# Altium PCB LST.PcbDoc (part 3 of 6)
Units mil, origin at the board's own origin, x right, y up, seen from the top; angles counter-clockwise.
Board outline 4330.71 x 4330.71 mil, 2 copper layers (Top Layer, Bottom Layer), stack 50 mil thick; 464 components, 242 nets, 1328 pads, 128 vias.
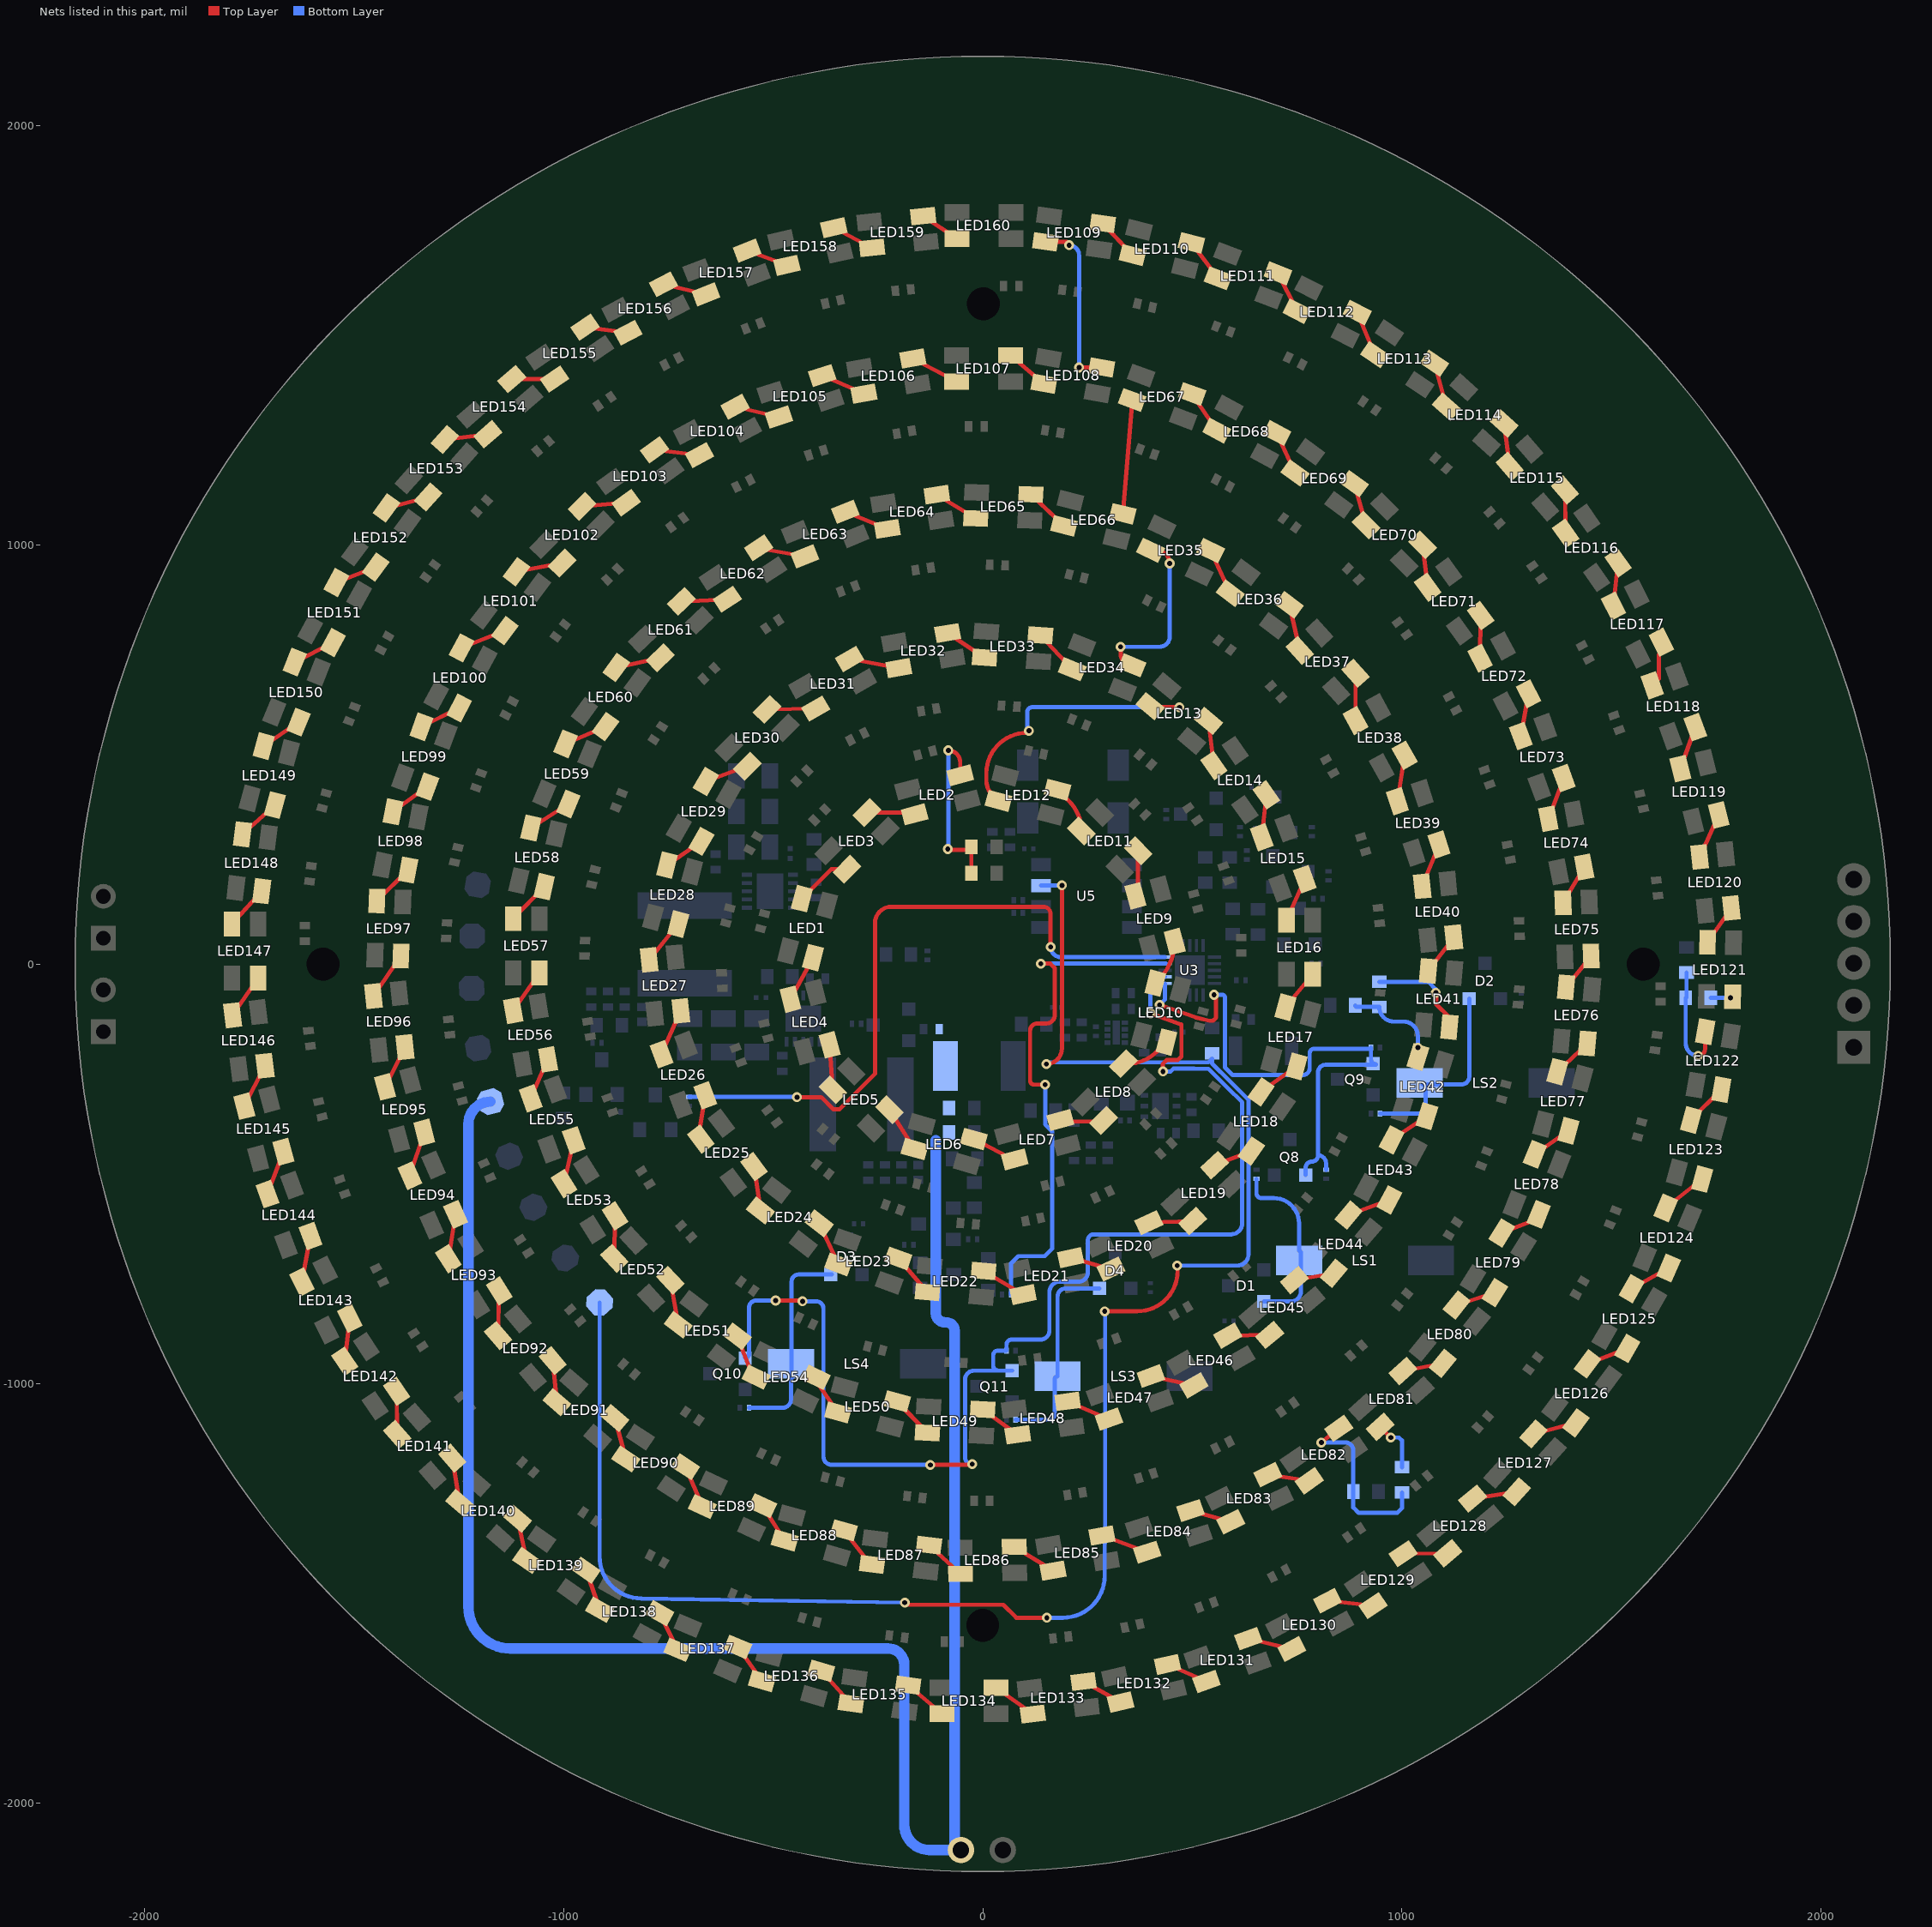
[diagram p2: the nets of this part, all layers, seen from the top]

## Part data (continued)
X1: library part CM200C32768DZFT, "CRYSTAL 32.7680KHZ 12.5PF SMD", Case/Package=SMD/SMT, ESR (Equivalent Series Resistance)=50kR, Frequency=32.768kHz, Frequency Tolerance=20ppm, Load Capacitance=12.5pF, Manufacturer=Citizen, Max Operating Temperature=85°C, Min Operating Temperature=-40°C, Package Quantity=3000, Supplier Part Number 1=695-CM200C-32768DZFT, Category=Crystals, ComponentLink1Description=https://datasheet.ciiva.com/13163/cm200c-citizen-187069-13163866.pdf?src-supplier=Mouser, ComponentLink1URL=https://datasheet.ciiva.com/13163/cm200c-citizen-187069-13163866.pdf?src-supplier=Mouser, ComponentLink2Description=https://datasheet.ciiva.com/16437/cm200c-250c-16437102.pdf?src-supplier=Future+Electronics, ComponentLink2URL=https://datasheet.ciiva.com/16437/cm200c-250c-16437102.pdf?src-supplier=Future+Electronics, ComponentLink3Description=https://datasheet.ciiva.com/48778/1673496-48778901.pdf?src-supplier=Element14, ComponentLink3URL=https://datasheet.ciiva.com/48778/1673496-48778901.pdf?src-supplier=Element14, Lead Free="Lead Free", Manufacturer Part Number=CM200C32768DZFT, Mount="Surface Mount", Packaging="Tape and Reel", Pricing 1="1=0.57000, 10=0.47500, 50=0.42700, 100=0.38000, 1000=0.30400, 10000=0.25400 (USD)", REACH SVHC=Unknown, RoHS=Yes, Stock 1=1, Supplier 1=Mouser

## Free pads (board coordinates)
  round 60 hole 78.74 unplated: MH1(2,1576) MH2(1576,0) MH3(0,-1577) MH4(-1574,0)

## Via types
v1: diameter 23.62, hole 11.81, Top Layer to Bottom Layer, tented top, 98 vias
v2: diameter 23.62, hole 11.81, Top Layer to Bottom Layer, 30 vias

## Nets (pads, with @x,y where several pads share a name; then routed paths per layer and width w, separated by ;. In a path a pad name is that pad's centre, name@x,y a point inside that pad or via, vN(x,y) a via of type N, cw(c..) or ccw(c..) an arc to the next point about the centre after c; other vN are vias at no path point)
A_LED_INPUT: LED2.4 SB1.2 SB2.2 | length 433.7
  Top Layer w10: v1(-83.29,275.13) ccw(c-81.55,275.13) -81.55,273.39 -34,273.39 ccw(c-34,280.39) SB2.2@-27,280.39 SB1.2@-27,217.39 ; v1(-82,510.39) cw(c-82,482.07) -53.68,482.07 LED2.4@-53.68,451.09
  Bottom Layer w10: v1@-82,276.42 v1(-82,510.39)
B_LED_INPUT: LED42.4 SB3.2 SB4.2 | length 245.5
  Top Layer w10: LED42.4@1038,-214.61 LED42.4@1039,-213.61 ; v1(1038,-198.61) 1038,-206.61 1042,-210.61 LED42.4@1039,-213.61 ; LED42.4@1038.13,-220.77 1039,-219.91 LED42.4@1039,-213.61
  Bottom Layer w10: SB4.2@889,-97.61 ccw(c893,-97.61) 893,-101.61 SB3.2@946,-101.61 ccw(c981,-101.61) 981,-136.61 1004,-136.61 cw(c1004,-170.61) 1038,-170.61 v1(1038,-198.61)
BAT_IN: C25.2 J2.1 P3.1 SB17.1 SB18.1 SW2.1 | length 4633.2
  Bottom Layer w10: J2.1@-68.5,-2112.61 J2.1@-52,-2112.61
  Bottom Layer w25: P3.1@-1174,-327.61 ccw(c-1174,-380.61) -1227,-380.61 -1227,-1532 ccw(c-1127,-1532) -1127,-1632 -226,-1632 cw(c-226,-1671) -187,-1671 -187,-2053 ccw(c-127.39,-2053) -165.34,-2098.97 ccw(c-127.39,-2053) -144.84,-2110 ccw(c-127.39,-2053) -127.39,-2112.61 J2.1@-68.5,-2112.61 ; -112,-420 -112,-832 ccw(c-90,-832) -90,-854 -87,-854 cw(c-87,-874) -67,-874 -67,-2097.61 ccw(c-52,-2097.61) J2.1@-52,-2112.61
BUZZ: D1.2 LS1.2 R28.1 | length 443.9
  Bottom Layer w10: R28.1@653,-511.44 653,-545.87 ccw(c664.74,-545.87) 664.74,-557.61 694.26,-557.61 cw(c694.26,-617.87) 754.52,-617.87 754.52,-683.61 cw(c754.52,-688.09) 759,-688.09 759,-780.61 cw(c735.6,-780.61) 735.6,-804.01 D1.2@670.75,-804.01
BUZZ1: D2.2 LS2.2 R29.1 | length 482.5
  Bottom Layer w10: R29.1@947.83,-355.61 1039,-355.61 ccw(c1039,-337.61) 1057,-337.61 1057,-294.09 ccw(c1049.52,-294.09) 1049.52,-286.61 1142.06,-286.61 ccw(c1142.06,-268.06) 1160.6,-268.06 D2.2@1160.6,-81.93
BUZZ2: D3.2 LS4.2 R30.1 | length 498.7
  Bottom Layer w10: R30.1@-557.6,-1057.61 -477,-1057.61 ccw(c-477,-1038.09) -457.48,-1038.09 -457.48,-988.61 ccw(c-457.48,-987.13) -456,-987.13 -456,-756.61 cw(c-439.32,-756.61) -439.32,-739.93 D3.2@-360.4,-739.93
BUZZ3: D4.2 LS3.2 R31.1 | length 496.7
  Bottom Layer w10: R31.1@78.4,-1086.61 158.24,-1086.61 ccw(c158.24,-1072.85) 172,-1072.85 172,-989.13 cw(c178.52,-989.13) LS3.2@178.52,-982.61 178.52,-792.61 cw(c198.2,-792.61) 198.2,-772.93 D4.2@278.6,-772.93
BUZZER: Q8.1 Q9.1 R24.1 R25.1 U3.6 | length 1354.6
  Top Layer w10: v1(422,-96.61) 508.01,-126.55 512.46,-127.84 541,-134.61 549.19,-134.61 556.73,-127.07 v1@556.73,-80.34
  Bottom Layer w10: v1(422,-96.61) 434.94,-83.67 U3.6@434.94,-45.6 ; v1(552,-72.61) 571.22,-72.61 cw(c571.22,-79.32) 577.93,-79.32 577.93,-245.93 596,-264 764,-264 ccw(c764,-248) 780,-248 780,-211.61 cw(c790,-211.61) 790,-201.61 923.17,-201.61 ccw(c923.17,-198.61) R25.1@926.17,-198.61 926.17,-226.05 ccw(c938.32,-226.05) 938.32,-238.2 cw(c936.91,-238.2) 936.91,-239.61 818,-239.61 ccw(c818,-257.61) 800,-257.61 800,-455.61 ; Q8.1@770.41,-502.36 770.41,-485.2 cw(c785,-485.2) 785,-470.61 ccw(c785,-455.61) 800,-455.61 ; R24.1@819,-489.78 819,-474.61 ccw(c800,-474.61) 800,-455.61
BUZZER_1: Q10.1 Q11.1 R26.1 R27.1 U3.7 | length 3129
  Top Layer w10: v2(-494,-802) -431.48,-802 cw(c-431.48,-803.73) v2(-429.74,-803.73) ; v2(-125,-1194) v2@-25,-1194 ; v1(400,-116.61) 473.99,-143.61 473.99,-220.01 466,-228 453.5,-228 453.43,-228.07 438.93,-228.07 430,-237 v1(430,-255.61)
  Bottom Layer w10: Q10.1@-566.68,-939.2 ccw(c-566.68,-930.13) -557.6,-930.13 R26.1@-557.6,-895.61 -557.6,-819.26 cw(c-540.34,-819.26) -540.34,-802 v2(-494,-802) ; v2(-429.74,-803.73) -397.35,-803.73 cw(c-397.35,-821.08) -380,-821.08 -380,-1174 ccw(c-360,-1174) -360,-1194 v2(-125,-1194) ; v2@-25,-1194 cw(c-25,-1177) -42,-1177 -42,-990 cw(c-21.2,-990) -21.2,-969.2 37,-969.2 ; Q11.1@70.32,-969.2 37,-969.2 ; v1(400,-116.61) 400,-42.61 412.76,-29.85 U3.7@434.94,-29.85 ; v1(430,-255.61) 448.21,-255.61 454.98,-248.85 504.23,-248.85 504.39,-249 538.57,-249 583.57,-294 583.79,-294 619,-329.21 619,-618 cw(c592.96,-618) 614.76,-632.24 cw(c592.96,-618) 607.2,-639.8 cw(c592.96,-618) 592.96,-644.04 264.96,-644.04 ccw(c264.96,-658) 251,-658 251,-734 cw(c227.75,-734) 227.75,-757.25 183.55,-757.25 ccw(c183.55,-781.81) 159,-781.81 159,-874 cw(c138,-874) 138,-895 69,-895 ccw(c69,-907.26) 56.74,-907.26 R27.1@56.74,-921.61 35.9,-921.61 ccw(c35.9,-932.51) 25,-932.51 25,-957.2 ccw(c37,-957.2) 37,-969.2
  other v2: -25,-1192
C_LED_INPUT: LED82.4 SB_L1.2 SB_L2.2 | length 439.9
  Top Layer w10: v1(808,-1140.61) LED82.4@849.05,-1107.1
  Bottom Layer w10: v1(808,-1140.61) 865.25,-1140.61 cw(c865.25,-1159.36) 884,-1159.36 SB_L2.2@884,-1257.61 884,-1295.61 897,-1308.61 989,-1308.61 1000,-1297.61 SB_L1.2@1000,-1259.61
CLK_OUT: P8.1 SB8.2 U5.7 | length 4387.3
  Top Layer w10: v1(-186,-1522.61) -180.98,-1527.63 49.02,-1527.63 80,-1558.61 v1(153,-1558.61) ; v1(152,-237.61) ccw(c152,-200.61) 189,-200.61 v1(189,188.39) ; v1(291,-827.61) 368.64,-827.61 ccw(c368.64,-731.25) 465,-731.25
  Bottom Layer w10: P8.1@-914,-806.61 -914,-1412.61 ccw(c-814,-1412.61) -814,-1512.61 v1(-186,-1522.61) ; U5.7@139.28,187.89 189,187.89 v1(189,188.39) ; v1(152,-237.61) 155.77,-233.85 420.92,-233.85 420.97,-233.8 447.62,-233.8 447.66,-233.85 538.15,-233.85 547,-225 547,-236.21 589.79,-279 590,-279 634,-323 634,-692.15 cw(c607.54,-692.15) 607.54,-718.61 v1(464,-718.61) ; v1(153,-1558.61) 191,-1558.61 ccw(c191,-1458.61) 291,-1458.61 291,-1381.61 cw(c292,-1381.61) 292,-1380.61 292,-828.61 ccw(c291,-828.61) v1(291,-827.61)
D_LED_INPUT: LED122.4 SB_L3.2 SB_L4.2 | length 283.5
  Top Layer w10: v1(1707,-218.11) ccw(c1707,-201.95) 1723.16,-201.95 LED122.4@1723.16,-160.64
  Bottom Layer w10: SB_L4.2@1679,-19.61 1679,-77.61 cw(c1677,-77.61) SB_L3.2@1677,-79.61 1677,-188.11 ccw(c1707,-188.11) v1(1707,-218.11)
DOUT1: LED2.2 LED3.4 | length 116.8
  Top Layer w10: LED3.4@-276.34,362.04 -165.72,362.04 LED2.2@-161.32,357.64
DOUT2: LED1.4 LED3.2 | length 136.6
  Top Layer w10: LED1.4@-431.33,156.81 -361.4,226.74 LED3.2@-323.66,226.74
DOUT3: LED1.2 LED4.4 | length 113
  Top Layer w10: LED4.4@-458.75,-83.29 LED1.2@-404.67,15.97
DOUT4: LED4.2 LED5.4 | length 107.6
  Top Layer w10: LED4.2@-365.25,-191.93 LED5.4@-357.65,-299.26
DOUT5: LED5.2 LED6.4 | length 111.6
  Top Layer w10: LED5.2@-222.35,-346.59 LED6.4@-162.42,-440.71
DOUT6: LED6.2 LED7.4 | length 112.3
  Top Layer w10: LED6.2@-21.14,-416.51 LED7.4@78.32,-468.61
DOUT7: LED7.2 LED8.4 | length 104.3
  Top Layer w10: LED7.2@186.96,-375.1 LED8.4@291.26,-374.26
DOUT8: LED8.2 LED10.4 | length 119.7
  Top Layer w10: LED8.2@335.66,-236.96 345.4,-236.96 ccw(c345.4,-136.96) 416.12,-207.67 LED10.4@438.33,-185.46
DOUT9: LED9.4 LED10.2 | length 112.9
  Top Layer w10: LED10.2@411.67,-44.62 420.29,-36 ccw(c329.65,54.64) LED9.4@457.84,54.64
DOUT10: LED9.2 LED11.4 | length 110.1
  Top Layer w10: LED9.2@364.33,163.27 370.65,169.59 LED11.4@370.65,270.73
DOUT11: LED11.2 LED12.4 | length 117.9
  Top Layer w10: LED12.4@178.42,416.72 206.06,389.08 cw(c135.35,318.36) 235.35,318.36 LED11.2@235.35,318.05
DOUT12: LED12.2 LED13.4 | length 762.3
  Top Layer w10: LED12.2@37.58,390.06 57.09,390.06 cw(c57.09,438.39) 8.76,438.39 8.76,455.77 cw(c105.38,455.77) 105.38,552.39 v1(110.38,557.39) ; LED13.4@399.55,616.07 ccw(c402.22,616.07) 402.22,613.39 v1(469.39,613.39) cw(c469.39,611.78) v1@471,611.78
  Bottom Layer w10: v1(110.38,557.39) cw(c110.38,561.77) 106,561.77 106,601.39 cw(c118,601.39) 118,613.39 v1(469.39,613.39)
DOUT13: LED13.2 LED14.4 | length 107.1
  Top Layer w10: LED13.2@538.45,580.71 LED14.4@551.49,474.44
DOUT14: LED14.2 LED15.4 | length 101.5
  Top Layer w10: LED15.4@665.69,303.42 LED14.2@676.51,404.34
DOUT15: LED15.2 LED16.4 | length 107.2
  Top Layer w10: LED16.4@724.8,105.39 LED15.2@768.31,203.35
DOUT16: LED16.2 LED17.4 | length 102.2
  Top Layer w10: LED17.4@721.91,-102.51 LED16.2@787,-23.74
DOUT17: LED17.2 LED18.4 | length 104
  Top Layer w10: LED18.4@664.05,-303.93 LED17.2@748.58,-243.34
DOUT18: LED18.2 LED19.4 | length 94.1
  Top Layer w10: LED19.4@553.01,-478.83 LED18.2@640.93,-445.39
DOUT19: LED19.2 LED20.4 | length 104.7
  Top Layer w10: LED20.4@396.37,-616.13 LED19.2@500.99,-612.39
DOUT20: LED20.2 LED21.4 | length 99.8
  Top Layer w10: LED21.4@209.69,-699.76 LED20.2@305.63,-727.09
DOUT21: LED21.2 LED22.4 | length 109.8
  Top Layer w10: LED22.4@2.03,-731.25 LED21.2@96.31,-787.46
DOUT22: LED22.2 LED23.4 | length 106.5
  Top Layer w10: LED23.4@-201.69,-701.47 LED22.2@-132.03,-781.97
DOUT23: LED23.2 LED24.4 | length 108
  Top Layer w10: LED24.4@-389.97,-617.85 LED23.2@-344.31,-715.75
DOUT24: LED24.2 LED25.4 | length 106
  Top Layer w10: LED25.4@-545.3,-482.46 LED24.2@-530.03,-587.37
DOUT25: LED25.2 LED26.4 | length 104.4
  Top Layer w10: LED25.2@-679.28,-415.65 LED26.4@-661.82,-312.74
DOUT26: LED26.2 LED27.4 | length 112.9
  Top Layer w10: LED26.2@-766.18,-214.48 LED27.4@-720.32,-111.26
DOUT27: LED27.2 LED28.4 | length 109.7
  Top Layer w10: LED27.2@-795.68,10.67 LED28.4@-726.67,95.97
DOUT28: LED28.2 LED29.4 | length 99.9
  Top Layer w10: LED28.2@-753.33,236.81 LED29.4@-671.13,293.6
DOUT29: LED29.2 LED30.4 | length 105.2
  Top Layer w10: LED29.2@-660.43,436.53 LED30.4@-561.66,472.74
DOUT30: LED30.2 LED31.4 | length 116
  Top Layer w10: LED30.2@-514.34,608.04 LED31.4@-398.37,610.17
DOUT31: LED31.2 LED32.4 | length 119.5
  Top Layer w10: LED31.2@-317.63,728.61 LED32.4@-200.19,706.55
DOUT32: LED32.2 LED33.4 | length 105.8
  Top Layer w10: LED32.2@-83.81,790.23 LED33.4@4.42,731.87
DOUT33: LED33.2 LED34.4 | length 111.1
  Top Layer w10: LED33.2@137.58,784.91 LED34.4@213.48,703.74
DOUT34: LED34.2 LED35.4 | length 429.3
  Top Layer w10: v1(329,757.39) 329,740.56 ccw(c356.52,740.56) LED34.2@356.52,713.04 ; LED35.4@400.33,987.74 414.65,987.74 cw(c414.65,956.39) v1(446,956.39)
  Bottom Layer w10: v1(329,757.39) 422,757.39 ccw(c422,781.39) 446,781.39 v1(446,956.39)
DOUT35: LED35.2 LED36.4 | length 112
  Top Layer w10: LED35.2@543.67,987.04 LED36.4@590.72,885.41
DOUT36: LED36.2 LED37.4 | length 111.7
  Top Layer w10: LED36.2@731.28,857.37 LED37.4@756.68,748.56
DOUT37: LED37.2 LED38.4 | length 112.4
  Top Layer w10: LED37.2@889.32,694.22 LED38.4@889.49,581.78
DOUT38: LED38.2 LED39.4 | length 111.1
  Top Layer w10: LED39.4@989.47,389.19 LED38.2@1006.51,499
DOUT39: LED39.2 LED40.4 | length 107.1
  Top Layer w10: LED40.4@1048.32,186.35 LED39.2@1088.53,285.59
DOUT40: LED40.2 LED41.4 | length 100.6
  Top Layer w10: LED41.4@1062.64,-15.58 LED40.2@1123.68,64.43
DOUT41: LED41.2 SB3.1 | length 246.1
  Top Layer w10: v1(1081,-67.61) 1082.57,-69.18 1082.57,-96.18 1112,-125.61 1112,-148.29 ccw(c1113.36,-148.29) LED41.2@1113.36,-149.64
  Bottom Layer w10: SB3.1@946,-41.61 1063,-41.61 1081,-59.61 v1(1081,-67.61)
DOUT42: LED42.2 LED43.4 | length 101.2
  Top Layer w10: LED43.4@975.62,-418.59 LED42.2@1059.87,-362.45
DOUT43: LED43.2 LED44.4 | length 103.8
  Top Layer w10: LED44.4@872.68,-598.16 LED43.2@969.92,-561.81
DOUT44: LED44.2 LED45.4 | length 95.2
  Top Layer w10: LED45.4@743.47,-753.28 LED44.2@837.32,-737.06
DOUT45: LED45.2 LED46.4 | length 99.6
  Top Layer w10: LED46.4@584.9,-885.74 LED45.2@684.53,-883.94
DOUT46: LED46.2 LED47.4 | length 103.3
  Top Layer w10: LED47.4@403.04,-983.3 LED46.2@504.17,-1004.18
DOUT47: LED47.2 LED48.4 | length 109.2
  Top Layer w10: LED48.4@202.61,-1042.82 LED47.2@302.96,-1085.92
DOUT48: LED48.2 LED49.4 | length 102.9
  Top Layer w10: LED49.4@0.11,-1061.93 LED48.2@83.39,-1122.4
DOUT49: LED49.2 LED50.4 | length 104.3
  Top Layer w10: LED50.4@-204.58,-1042.28 LED49.2@-132.11,-1117.29
DOUT50: LED50.2 LED54.4 | length 105.1
  Top Layer w10: LED54.4@-405.33,-982.65 LED50.2@-345.42,-1068.94
DOUT51: LED51.4 LED54.2 | length 101.3
  Top Layer w10: LED51.4@-585.72,-887.63 LED54.2@-548.67,-981.95
DOUT52: LED51.2 LED52.4 | length 107.7
  Top Layer w10: LED52.4@-745.27,-753.62 LED51.2@-726.28,-859.59
DOUT53: LED52.2 LED53.4 | length 101.7
  Top Layer w10: LED52.2@-878.83,-701.6 LED53.4@-877.55,-599.88
DOUT54: LED53.2 LED55.4 | length 106.2
  Top Layer w10: LED53.2@-998.73,-523.34 LED55.4@-975.69,-419.65
DOUT55: LED55.2 LED56.4 | length 104.4
  Top Layer w10: LED55.2@-1078.31,-319.58 LED56.4@-1036.74,-223.81
DOUT56: LED56.2 LED57.4 | length 109.8
  Top Layer w10: LED56.2@-1120.42,-110.44 LED57.4@-1057.9,-20.18
DOUT57: LED57.2 LED58.4 | length 106.4
  Top Layer w10: LED57.2@-1120.1,108.96 LED58.4@-1046.22,185.48
DOUT58: LED58.2 LED59.4 | length 106.1
  Top Layer w10: LED58.2@-1077.78,325.3 LED59.4@-988.6,382.8
DOUT59: LED59.2 LED60.4 | length 104
  Top Layer w10: LED59.2@-995.4,525.98 LED60.4@-899.79,566.87
DOUT60: LED60.2 LED61.4 | length 107.9
  Top Layer w10: LED60.2@-874.21,707.91 LED61.4@-768.84,731.16
DOUT61: LED61.2 LED62.4 | length 108
  Top Layer w10: LED61.2@-719.16,865.61 LED62.4@-611.21,870.14
DOUT62: LED62.2 LED63.4 | length 114.2
  Top Layer w10: LED62.2@-536.79,992.64 LED63.4@-424.21,973.36
DOUT63: LED63.2 LED64.4 | length 108.5
  Top Layer w10: LED63.2@-327.79,1079.41 LED64.4@-227.22,1038.57
DOUT64: LED64.2 LED65.4 | length 108.7
  Top Layer w10: LED64.2@-109.41,1120.21 LED65.4@-16.61,1063.56
DOUT65: LED65.2 LED66.4 | length 109.4
  Top Layer w10: LED65.2@114.61,1121.22 LED66.4@193.83,1045.83
DOUT66: LED66.2 LED67.4 | length 272.2
  Top Layer w10: LED66.2@334.17,1074.95 LED67.4@356.69,1346.25
DOUT67: LED67.2 LED68.4 | length 105.4
  Top Layer w10: LED67.2@499.31,1360.53 LED68.4@558.39,1273.24
DOUT68: LED68.2 LED69.4 | length 105
  Top Layer w10: LED68.2@701.61,1267.54 LED69.4@745.48,1172.18
DOUT69: LED69.2 LED70.4 | length 102.4
  Top Layer w10: LED69.2@886.52,1146.6 LED70.4@914.35,1048.05
DOUT70: LED70.2 LED71.4 | length 101.8
  Top Layer w10: LED70.2@1049.65,1000.73 LED71.4@1061.5,899.57
DOUT71: LED71.2 LED72.4 | length 101.5
  Top Layer w10: LED72.4@1186.45,730.2 LED71.2@1187.73,831.66
DOUT72: LED72.2 LED73.4 | length 102.6
  Top Layer w10: LED73.4@1283.69,544.42 LED72.2@1302,645.39
DOUT73: LED73.2 LED74.4 | length 103.9
  Top Layer w10: LED74.4@1349.3,347.28 LED73.2@1386.31,444.35
DOUT74: LED74.2 LED75.4 | length 99.3
  Top Layer w10: LED75.4@1384.66,146.83 LED74.2@1435,232.39
DOUT75: LED75.2 LED76.4 | length 95.5
  Top Layer w10: LED76.4@1391.64,-54.58 LED75.2@1451.34,19.95
DOUT76: LED76.2 LED77.4 | length 98.5
  Top Layer w10: LED77.4@1370.67,-256.19 LED76.2@1442.36,-188.64
DOUT77: LED77.2 LED78.4 | length 97.7
  Top Layer w10: LED78.4@1317.35,-453.09 LED77.2@1397.33,-397.03
DOUT78: LED78.2 LED79.4 | length 84
  Top Layer w10: LED79.4@1237.84,-640.37 LED78.2@1316.18,-610.09
DOUT79: LED79.2 LED80.4 | length 96.2
  Top Layer w10: LED80.4@1130.66,-812.46 LED79.2@1222.16,-782.85
DOUT80: LED80.2 LED81.4 | length 97.3
  Top Layer w10: LED81.4@1002.17,-970.29 LED80.2@1097.73,-951.97
DOUT81: LED81.2 SB_L1.1 | length 129.7
  Top Layer w10: LED81.2@947.83,-1102.93 v1(973.56,-1128.66)
  Bottom Layer w10: v1(973.56,-1128.66) 993.05,-1128.66 1000,-1135.61 SB_L1.1@1000,-1199.61
DOUT82: LED82.2 LED83.4 | length 99.7
  Top Layer w10: LED83.4@680.4,-1217.35 LED82.2@778.95,-1232.12
DOUT83: LED83.2 LED84.4 | length 99.5
  Top Layer w10: LED84.4@495.8,-1303.08 LED83.2@591.6,-1329.87
DOUT84: LED84.2 LED85.4 | length 115.1
  Top Layer w10: LED85.4@284.2,-1362.35 LED84.2@392.2,-1402.14
DOUT85: LED85.2 LED86.4 | length 108.7
  Top Layer w10: LED86.4@75.01,-1389.39 LED85.2@167.83,-1446.03
DOUT86: LED86.2 LED87.4 | length 101.5
  Top Layer w10: LED87.4@-128.12,-1385.61 LED86.2@-53.01,-1453.83
DOUT87: LED87.2 LED88.4 | length 88.2
  Top Layer w10: LED88.4@-331.03,-1350.14 LED87.2@-277.07,-1419.89
DOUT88: LED88.2 LED89.4 | length 98.2
  Top Layer w10: LED89.4@-525.34,-1291.71 LED88.2@-472.31,-1374.34
DOUT89: LED89.2 LED90.4 | length 103.4
  Top Layer w10: LED90.4@-708.91,-1198.27 LED89.2@-668.66,-1293.51
DOUT90: LED90.2 LED91.4 | length 101.3
  Top Layer w10: LED91.4@-877.73,-1082.38 LED90.2@-851.09,-1180.1
DOUT91: LED91.2 LED92.4 | length 100.1
  Top Layer w10: LED92.4@-1025.67,-944.97 LED91.2@-1016,-1044.61
DOUT92: LED92.2 LED93.4 | length 107.2
  Top Layer w10: LED92.2@-1156.33,-886.03 LED93.4@-1153.41,-778.88
DOUT93: LED93.2 LED94.4 | length 107.1
  Top Layer w10: LED93.2@-1274.59,-702.34 LED94.4@-1257.48,-596.58
DOUT94: LED94.2 LED95.4 | length 108.6
  Top Layer w10: LED94.2@-1366.83,-503.91 LED95.4@-1332.25,-400.93
DOUT95: LED95.2 LED96.4 | length 105.9
  Top Layer w10: LED95.2@-1425.75,-292.29 LED96.4@-1378.32,-197.57
DOUT96: LED96.2 LED97.4 | length 116.1
  Top Layer w10: LED96.2@-1453.68,-75.65 LED97.4@-1387.82,19.95
DOUT97: LED97.2 LED98.4 | length 105.1
  Top Layer w10: LED97.2@-1445.48,151.17 LED98.4@-1370.79,225.07
DOUT98: LED98.2 LED99.4 | length 102.1
  Top Layer w10: LED98.2@-1407.21,363.7 LED99.4@-1324.86,424.08
DOUT99: LED99.2 LED100.4 | length 100.9
  Top Layer w10: LED99.2@-1339.14,566.7 LED100.4@-1248.85,611.78
DOUT100: LED100.2 LED101.4 | length 111
  Top Layer w10: LED100.2@-1243.15,755 LED101.4@-1140.02,796.11
DOUT101: LED101.2 LED102.4 | length 110.6
  Top Layer w10: LED101.2@-1111.98,936.67 LED102.4@-1003.33,957.09
DOUT102: LED102.2 LED103.4 | length 105.4
  Top Layer w10: LED102.2@-956,1092.39 LED103.4@-850.95,1101.28
DOUT103: LED103.2 LED104.4 | length 108.4
  Top Layer w10: LED103.2@-783.05,1227.5 LED104.4@-675.41,1214.62
DOUT104: LED104.2 LED105.4 | length 106.9
  Top Layer w10: LED104.2@-590.59,1330.16 LED105.4@-486.59,1305.63
DOUT105: LED105.2 LED106.4 | length 108.7
  Top Layer w10: LED105.2@-383,1404.7 LED106.4@-283.19,1361.55
DOUT106: LED106.2 LED107.4 | length 117.8
  Top Layer w10: LED106.2@-166.81,1445.23 LED107.4@-62.57,1390.29
DOUT107: LED107.2 LED108.4 | length 104.3
  Top Layer w10: LED107.2@66.57,1452.49 LED108.4@146.01,1384.97
DOUT108: LED108.2 LED109.4 | length 420.2
  Top Layer w10: LED109.4@149.73,1723.58 197.81,1723.58 cw(c197.81,1715.39) v1(206,1715.39) ; v1(230,1423.81) LED108.2@283.99,1423.81
  Bottom Layer w10: v1(206,1715.39) cw(c206,1691.39) 230,1691.39 v1(230,1423.81)
DOUT109: LED109.2 LED110.4 | length 103.7
  Top Layer w10: LED109.2@286.27,1767.2 LED110.4@357.43,1691.83
DOUT110: LED110.2 LED111.4 | length 105.8
  Top Layer w10: LED110.2@497.78,1720.95 LED111.4@561.58,1636.49
DOUT111: LED111.2 LED112.4 | length 101.1
  Top Layer w10: LED111.2@704.42,1648.29 LED112.4@749.94,1558.02
DOUT112: LED112.2 LED113.4 | length 108.7
  Top Layer w10: LED112.2@893.24,1554.81 LED113.4@935.58,1454.71
DOUT113: LED113.2 LED114.4 | length 107.5
  Top Layer w10: LED113.2@1077.43,1434.07 LED114.4@1106.21,1330.48
DOUT114: LED114.2 LED115.4 | length 102.9
  Top Layer w10: LED114.2@1243.79,1290.3 LED115.4@1257.17,1188.24
DOUT115: LED115.2 LED116.4 | length 103.2
  Top Layer w10: LED115.2@1388.83,1131.59 LED116.4@1390.49,1028.44
DOUT116: LED116.2 LED117.4 | length 103.7
  Top Layer w10: LED117.4@1504.95,855.21 LED116.2@1515.51,958.34
DOUT117: LED117.2 LED118.4 | length 102.3
  Top Layer w10: LED118.4@1597.38,665.77 1613,681.39 1613,739 LED117.2@1629,755
DOUT118: LED118.2 LED119.4 | length 105.4
  Top Layer w10: LED119.4@1664.2,466.51 LED118.2@1700,565.7
DOUT119: LED119.2 LED120.4 | length 109.8
  Top Layer w10: LED120.4@1710.32,256.35 LED119.2@1755.8,356.26
DOUT120: LED120.2 LED121.4 | length 99.6
  Top Layer w10: LED121.4@1729.03,52.49 LED120.2@1785.68,134.43
DOUT121: LED121.2 SB_L3.1 | length 48.6
  Bottom Layer w10: SB_L3.1@1737,-79.61 v1(1784,-79.61) cw(c1784,-80.61) v1@1785,-80.61
DOUT122: LED122.2 LED123.4 | length 102.5
  Top Layer w10: LED123.4@1689.67,-371.19 LED122.2@1762,-298.61
DOUT123: LED123.2 LED124.4 | length 110.8
  Top Layer w10: LED124.4@1629.6,-581.02 LED123.2@1716.33,-512.03
DOUT124: LED124.2 LED125.4 | length 101.1
  Top Layer w10: LED125.4@1548.13,-773.51 LED124.2@1636.4,-724.2
DOUT125: LED125.2 LED126.4 | length 101.3
  Top Layer w10: LED126.4@1443.02,-953.08 LED125.2@1537.43,-916.44
DOUT126: LED126.2 LED127.4 | length 104.4
  Top Layer w10: LED127.4@1314.09,-1120.39 LED126.2@1414.98,-1093.64
DOUT127: LED127.2 LED128.4 | length 106.7
  Top Layer w10: LED128.4@1168.47,-1274.28 LED127.2@1273.91,-1257.98
DOUT128: LED128.2 LED129.4 | length 106.2
  Top Layer w10: LED129.4@1003.35,-1406.04 LED128.2@1109.53,-1404.94
DOUT129: LED129.2 LED130.4 | length 109.3
  Top Layer w10: LED130.4@822.41,-1517.84 LED129.2@931.08,-1529.82
DOUT130: LED130.2 LED131.4 | length 106.7
  Top Layer w10: LED131.4@633.9,-1608.3 LED130.2@737.59,-1633.38
DOUT131: LED131.2 LED132.4 | length 101.6
  Top Layer w10: LED132.4@440.74,-1670.22 LED131.2@533.83,-1710.92
DOUT132: LED132.2 LED133.4 | length 101.3
  Top Layer w10: LED133.4@240.3,-1710.87 LED132.2@328.91,-1759.88
DOUT133: LED133.2 LED134.4 | length 108
  Top Layer w10: LED134.4@32,-1725.41 LED133.2@119.7,-1788.35
DOUT134: LED134.2 LED135.4 | length 105.4
  Top Layer w10: LED135.4@-177.86,-1719.8 LED134.2@-97.13,-1787.61
DOUT135: LED135.2 LED136.4 | length 105.4
  Top Layer w10: LED136.4@-385.36,-1685.51 LED135.2@-314.39,-1763.42
DOUT136: LED136.2 LED137.4 | length 99.9
  Top Layer w10: LED137.4@-584.41,-1628.21 LED136.2@-526.64,-1709.71
DOUT137: LED137.2 LED138.4 | length 97.3
  Top Layer w10: LED138.4@-770.45,-1547.71 LED137.2@-727.59,-1635.01
DOUT138: LED138.2 LED139.4 | length 99.9
  Top Layer w10: LED139.4@-946.27,-1445.17 LED138.2@-913.55,-1539.51
DOUT139: LED139.2 LED140.4 | length 102.1
  Top Layer w10: LED140.4@-1109.73,-1322.38 LED139.2@-1087.73,-1422.05
DOUT140: LED140.2 LED141.4 | length 108
  Top Layer w10: LED141.4@-1265.17,-1177.93 LED140.2@-1248,-1284.61
DOUT141: LED141.2 LED142.4 | length 102.5
  Top Layer w10: LED142.4@-1398.11,-1018.75 LED141.2@-1396.83,-1121.29
DOUT142: LED142.2 LED143.4 | length 102.8
  Top Layer w10: LED142.2@-1521.89,-946.47 LED143.4@-1509.97,-844.34
DOUT143: LED143.2 LED144.4 | length 111.2
  Top Layer w10: LED143.2@-1624.03,-757.52 LED144.4@-1603.69,-648.19
DOUT144: LED144.2 LED145.4 | length 108.1
  Top Layer w10: LED144.2@-1706.31,-548.12 LED145.4@-1668.25,-446.93
DOUT145: LED145.2 LED146.4 | length 108.4
  Top Layer w10: LED145.2@-1761.75,-338.29 LED146.4@-1712.26,-241.91
DOUT146: LED146.2 LED147.4 | length 107.5
  Top Layer w10: LED146.2@-1789.74,-121.32 LED147.4@-1728.9,-32.67
DOUT147: LED147.2 LED148.4 | length 105.6
  Top Layer w10: LED147.2@-1791.1,96.47 LED148.4@-1720,174.51
DOUT148: LED148.2 LED149.4 | length 104.1
  Top Layer w10: LED148.2@-1766,310.27 LED149.4@-1688.67,379.97
DOUT149: LED149.2 LED150.4 | length 100.7
  Top Layer w10: LED149.2@-1715.33,520.81 LED150.4@-1632.35,577.87
DOUT150: LED150.2 LED151.4 | length 102.9
  Top Layer w10: LED150.2@-1641.65,720.91 LED151.4@-1550.1,767.84
DOUT151: LED151.2 LED152.4 | length 100.7
  Top Layer w10: LED151.2@-1541.9,910.94 LED152.4@-1448,947.39
DOUT152: LED152.2 LED153.4 | length 102.7
  Top Layer w10: LED152.2@-1422.42,1088.42 LED153.4@-1323.09,1114.6
DOUT153: LED153.2 LED154.4 | length 103.3
  Top Layer w10: LED153.2@-1282.91,1252.18 LED154.4@-1180.32,1264.56
DOUT154: LED154.2 LED155.4 | length 102.5
  Top Layer w10: LED154.2@-1123.68,1396.22 LED155.4@-1021.14,1396.5
DOUT155: LED155.2 LED156.4 | length 103.4
  Top Layer w10: LED155.2@-948.86,1520.28 LED156.4@-846.41,1506.62
DOUT156: LED156.2 LED157.4 | length 104.2
  Top Layer w10: LED156.2@-761.59,1622.16 LED157.4@-660.13,1598.21
DOUT157: LED157.2 LED158.4 | length 101.2
  Top Layer w10: LED157.2@-561.87,1702.56 LED158.4@-466.92,1667.56
DOUT158: LED158.2 LED159.4 | length 103
  Top Layer w10: LED158.2@-355.08,1757.22 LED159.4@-263.96,1709.21
DOUT159: LED159.2 LED160.4 | length 96.5
  Top Layer w10: LED159.2@-142.04,1784.57 LED160.4@-61.57,1731.29
EN_CO_1: R32.2 U3.9 | length 1274.3
  Top Layer w10: v2(138.64,1.64) 161.36,1.64 171.81,-8.81 171.81,-121.19 cw(c152.13,-121.19) 152.13,-140.87 130.38,-140.87 ccw(c130.38,-158.25) 113,-158.25 113,-277.19 ccw(c122.81,-277.19) 122.81,-287 v2(149,-287)
  Bottom Layer w10: R32.2@67.57,-787.93 67.57,-713.43 85,-696 148,-696 166,-678 166,-399 149,-382 v2(149,-287) ; v2(138.64,1.64) U3.9@434.94,1.64 U3.9@436.94,1.64
EN_CO_2: R33a.2 U3.10 | length 1667.7
  Top Layer w10: v2(-443,-317) -391,-317 -385,-317 -356,-346 -342,-346 -257,-261 -257,98.39 cw(c-218,98.39) -218,137.39 145,137.39 cw(c145,120.39) 162,120.39 v1(162,41.39)
  Bottom Layer w10: R33a.2@-701,-316.17 -443.83,-316.17 cw(c-443.83,-317) v2(-443,-317) ; v1(162,41.39) ccw(c186,41.39) 186,17.39 U3.10@434.94,17.39